# Altium PCB SmartSwitchD2_PowerBoard_1v2.PCBDOC
Units mm, origin at the board's own origin, x right, y up, seen from the top; angles counter-clockwise.
Board outline 44 x 47.9 mm, 2 copper layers (Top Layer, Bottom Layer), stack 1.443 mm thick; 10 components, 4 nets, 18 pads, 31 vias.
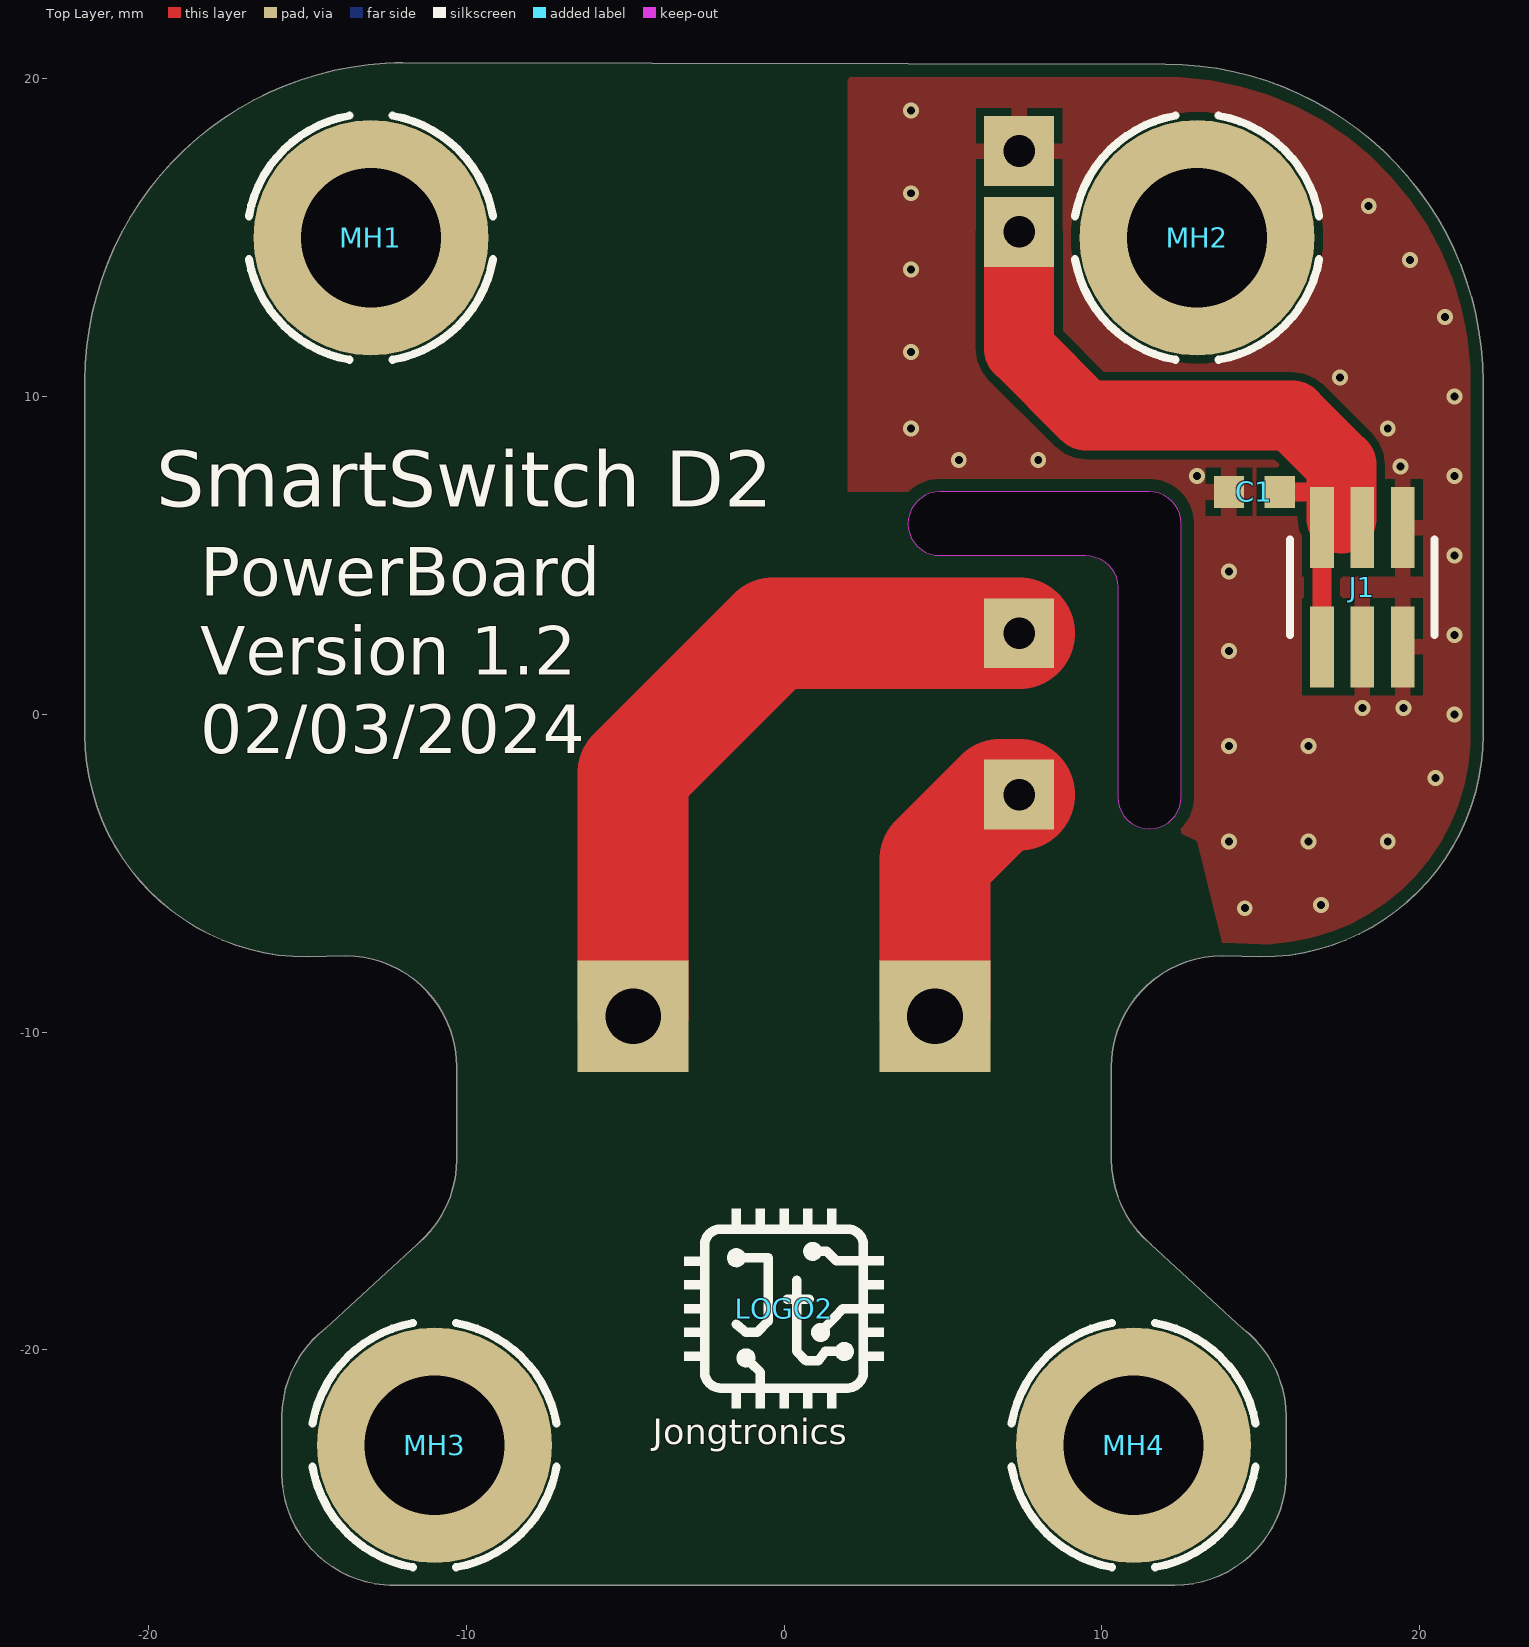
[diagram p0: Top Layer view]
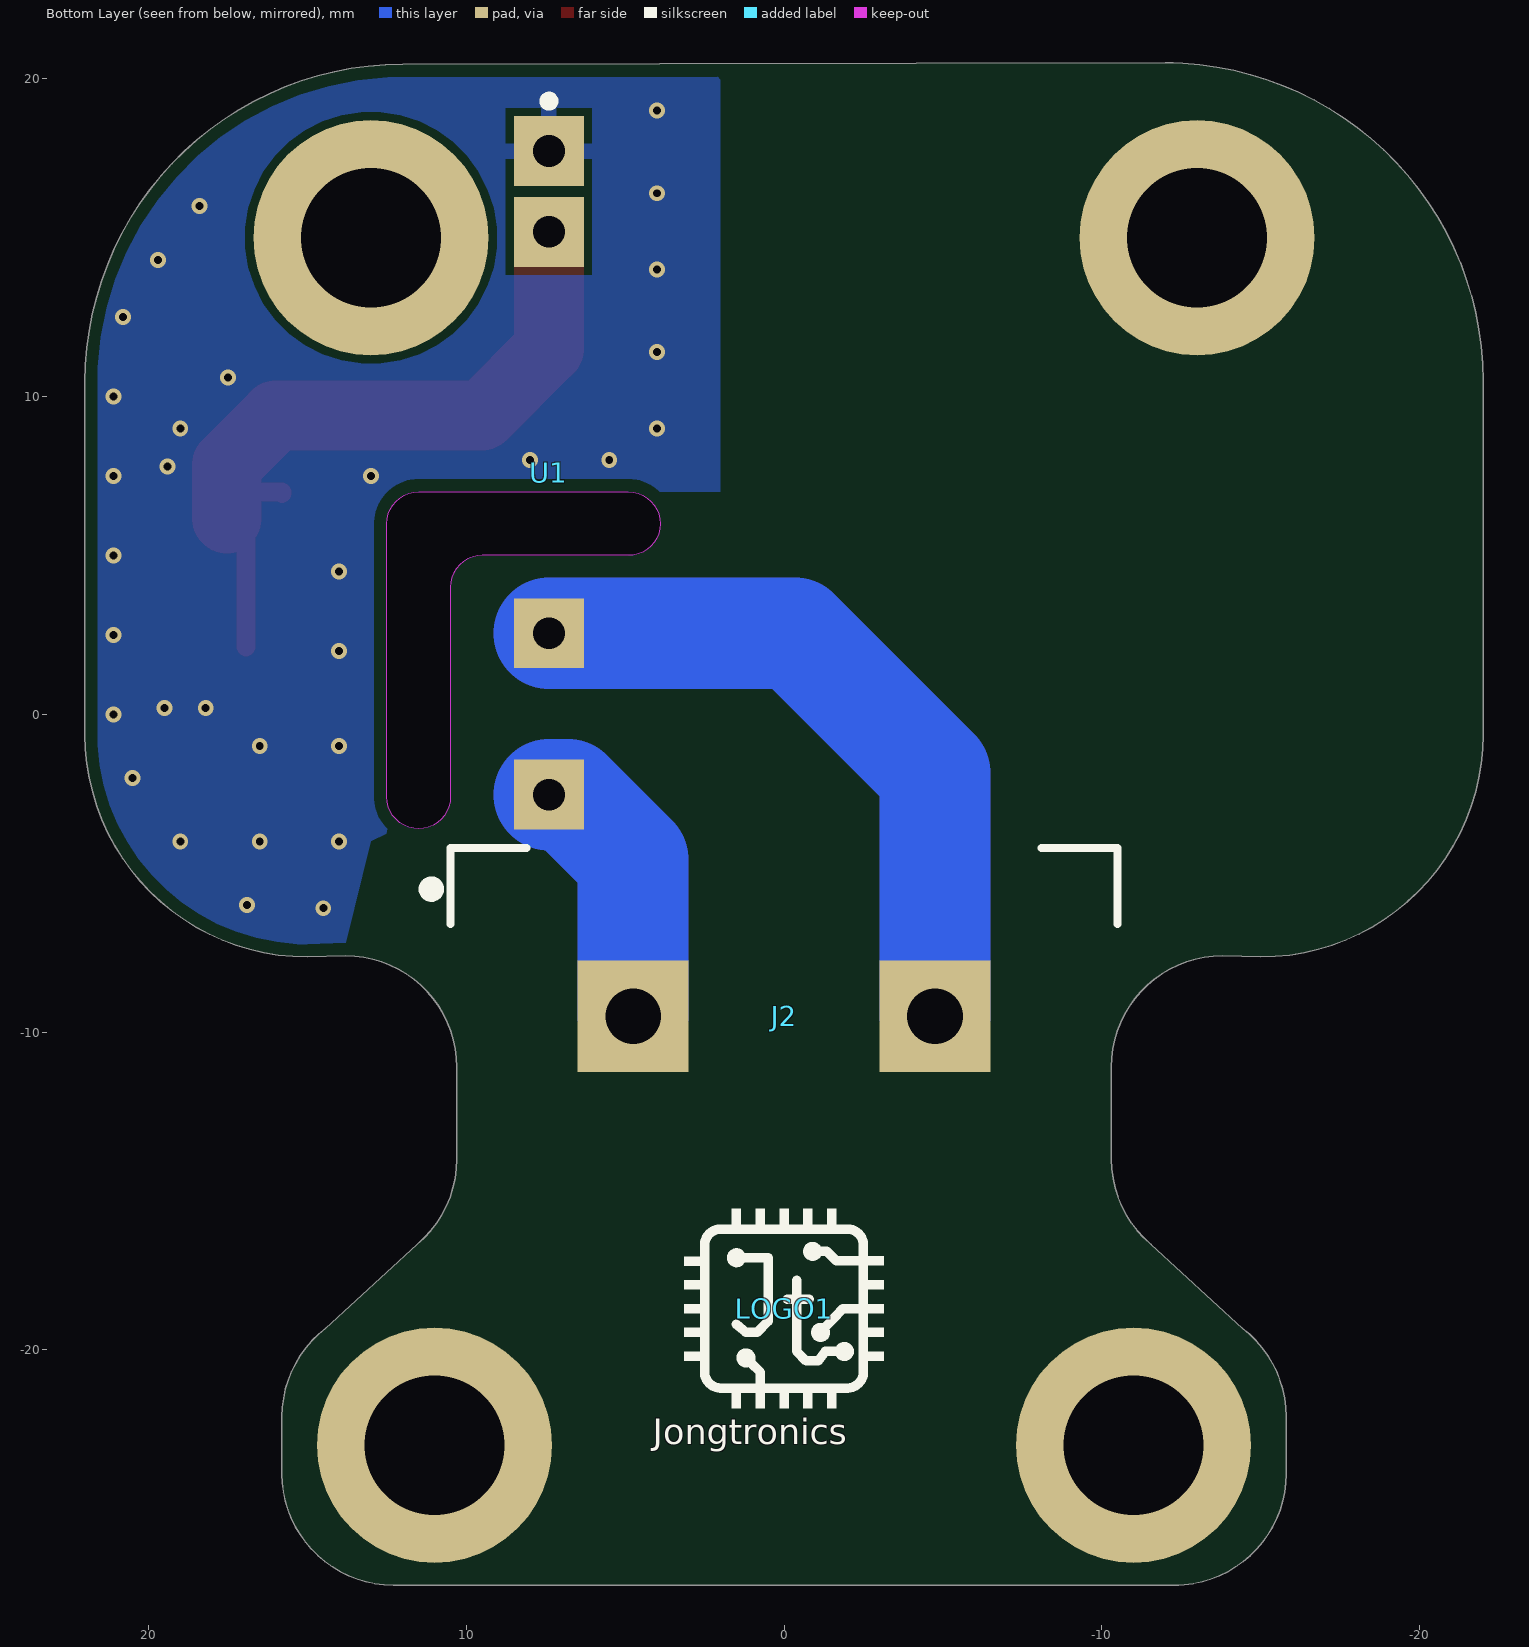
[diagram p1: Bottom Layer view, seen from below]

## Layer stack, top to bottom
TopSolder: solder mask 0.0127, Solder Resist, Dk 3.8
Top Layer: signal copper 0.035
Dielectric 1: core 0.0864, Composite dielectric, Dk 4.29
Dielectric 2: core 1.2, Composite dielectric, Dk 4.29
Dielectric 3: core 0.0864, Composite dielectric, Dk 4.29
Bottom Layer: signal copper 0.035
BottomSolder: solder mask 0.0127, Solder Resist, Dk 3.8

## Board outline
-15.8,-23.9 ccw(c-12.3,-23.9) -12.3,-27.4 -12.415,-27.4 12.3,-27.4 ccw(c12.3,-23.9) 15.8,-23.9 15.8,-22.1 ccw(c12.3,-22.1) 14.431,-19.323 11.549,-16.68 cw(c13.8,-14) 10.3,-14 10.3,-11.1 cw(c13.8,-11.1) 13.8,-7.6 15,-7.634 ccw(c15,-0.634) 22,-0.634 22,10.7 22,10.459 ccw(c12,10.459) 12,20.459 -12.246,20.5 -12,20.5 ccw(c-12,10.5) -22,10.5 -22,-0.634 ccw(c-15,-0.634) -15,-7.634 -13.8,-7.6 cw(c-13.8,-11.1) -10.3,-11.1 -10.3,-14 cw(c-13.8,-14) -11.549,-16.68 -14.431,-19.323 ccw(c-12.3,-22.1) -15.8,-22.1
cut-out: 3.9,6 ccw(c4.9,6) 4.9,5 9.5,5 cw(c9.5,4) 10.5,4 10.5,-2.6 ccw(c11.5,-2.6) 11.5,-3.6 ccw(c11.5,-2.6) 12.5,-2.6 12.5,6 ccw(c11.5,6) 11.5,7 4.9,7 ccw(c4.9,6)

## Design rules (kind name [scope] priority, off if disabled: settings)
BoardOutlineClearance [All] p1: gap=0.4 ignorepadtopadclearanceinfootprint=FALSE
Clearance ViaToPad [IsVia vs IsPad] p1: gap=0 ignorepadtopadclearanceinfootprint=FALSE except(0.254: SMDPad-Via)
Clearance [All] p2: gap=0.254 ignorepadtopadclearanceinfootprint=FALSE except(0.127: Arc-Arc Arc-Track Arc-SMDPad Arc-THPad Arc-Via Track-Track Track-SMDPad Track-THPad Track-Via SMDPad-SMDPad SMDPad-THPad)
ComponentClearance [All] p1: gap=0 collisioncheckmode=3 verticalgap=0 showdistances=TRUE checkcomponentboundary=TRUE
DiffPairsRouting DiffPairCAN [InDifferentialPair('CAN')] p1: maxlimit=0.165 minlimit=0.165 mostfreqgap=0.165 toplayer_minwidth=0.108 toplayer_maxwidth=0.108 toplayer_prefwidth=0.108 bottomlayer_minwidth=0.108 bottomlayer_maxwidth=0.108 bottomlayer_prefwidth=0.108 maxuncoupledlength=12.7 // 120Ohm
DiffPairsRouting DiffPairUSB [InDifferentialPair('ESP_USB')] p2: maxlimit=0.127 minlimit=0.127 mostfreqgap=0.127 toplayer_minwidth=0.206 toplayer_maxwidth=0.206 toplayer_prefwidth=0.206 bottomlayer_minwidth=0.206 bottomlayer_maxwidth=0.206 bottomlayer_prefwidth=0.206 maxuncoupledlength=12.7 // 90Ohm
FabricationTestPointUsage TestPointUsage [All] p1: valid=0 allowmultiple=FALSE
FabricationTestpoint Testpoint [All] p1: side=3 testpointundercomponent=TRUE minsize=1.016 maxsize=2.54 preferedsize=1.524 minholesize=0.508 maxholesize=1.016 preferedholesize=0.813 testpointgrid=0.025 allowsidetop=TRUE allowsidebottom=TRUE usegrid=TRUE gridtolerance=0
PlaneClearance [All] p1: clearance=0.254
PolygonConnect [All] p1: thpad.connectstyle=Relief thpad.reliefconductorwidth=0.508 thpad.reliefentries=4 thpad.polygonreliefangle="90 Angle" thpad.airgapwidth=0.254 smdpad.connectstyle=Relief smdpad.reliefconductorwidth=0.508 smdpad.reliefentries=4 smdpad.polygonreliefangle="90 Angle" smdpad.airgapwidth=0.254 via.connectstyle=Direct via.reliefconductorwidth=0.254 via.reliefentries=4 via.polygonreliefangle="90 Angle" via.airgapwidth=0.254
RoutingVias ViasPower [InNetClass('Power')] p1: holewidth=0.3 width=0.6 viastyle="Through Hole" minholewidth=0.25 minwidth=0.5 maxholewidth=0.3 maxwidth=0.6
RoutingVias Vias [All] p2: holewidth=0.25 width=0.5 viastyle="Through Hole" minholewidth=0.25 minwidth=0.5 maxholewidth=0.3 maxwidth=0.6
SilkToSolderMaskClearance SilkscreenOverComponentPads [IsPad] p1: minsilkscreentomaskgap=0.254 clearancetoexposedcopper=TRUE
SolderMaskExpansion SolderMaskExpansionVia [IsVia] p1: expansion=0 istentingtop=TRUE
SolderMaskExpansion [All] p2: expansion=0.051 istentingtop=FALSE
Width Width50Ohm [InNetClass('50Ohm')] p1: maxlimit=0.14 minlimit=0.14 preferedwidth=0.14 minimp=50.000000 maximp=50.000000 favimp=50.000000
Width WidthPower [InNetClass('Power')] p2: maxlimit=3.5 minlimit=0.203 preferedwidth=0.508 minimp=50.000000 maximp=50.000000 favimp=50.000000
Width [All] p3: maxlimit=1.143 minlimit=0.102 preferedwidth=0.165 minimp=50.000000 maximp=50.000000 favimp=50.000000
24 further rules are at their usual default settings.

## Classes and differential pairs
net class Power: AC_IN_L AC_IN_N GND VCC

## Components (designator, comment, footprint, x,y, rotation, side; value= is the part's Value field where it differs from the comment)
C1 "CAP-0603 10uF 35VDC 20% X5R" C0603 14.8,7 r0 top value=10uF
J1 "Header Male 2x3 - 3mm height - 0.05\" (1.27mm)" "HEADER MALE 2x3 1.27MM" 18.2,4 r0 top
J2 "Thermal Block 9.5mm pitch 750V Screw terminal 1x2" "TH Block HB9500 1x2" 4.75,-9.5 r180 bottom
LOGO1 "Logo Jongtronics" LOGO_JONGTRONICS 0,-18.7 r180 bottom
LOGO2 "Logo Jongtronics" LOGO_JONGTRONICS 0,-18.7 r0 top
MH1 "Spacer Threaded M3 x 4mm SMD" "SPACER THREADED M3 x 4mm" -13,15 r0 top locked
MH2 "Spacer Threaded M3 x 4mm SMD" "SPACER THREADED M3 x 4mm" 13,15 r0 top locked
MH3 "Spacer Threaded M3 x 4mm SMD" "SPACER THREADED M3 x 4mm" -11,-23 r0 top locked
MH4 "Spacer Threaded M3 x 4mm SMD" "SPACER THREADED M3 x 4mm" 11,-23 r0 top locked
U1 "AC-DC 5V 700mA Precision Buck Converter Step Down Transformator Module" WX-DC12003 7.4,7.6 r270 bottom locked

## Footprints (in the part's own frame and the unit in brackets; to place one, negate y for a bottom-side part, rotate by r counter-clockwise, add the part's x,y. Pads: shape width x height; smd on the part's side, far side on the other; paste and mask are expansions set on the pad)
C0603 [mm] "C0603"
  rect 0.95x1 smd: 1(-0.8,0) 2(0.8,0)
  body extent -0.8,-0.4 0.8,0.4, height 0.87
"HEADER MALE 2x3 1.27MM" [mm]
  rect 0.74x2.55 smd: 1(-1.27,-1.875) 2(-1.27,1.875) 3(0,-1.875) 4(0,1.875) 5(1.27,-1.875) 6(1.27,1.875)
  silkscreen extent -2.27,-1.5 2.27,1.5, body extent -2.15,-2.75 2.15,2.75, height 5.33
LOGO_JONGTRONICS [mm]
  silkscreen extent -3.15,-3.15 3.15,3.15
"SPACER THREADED M3 x 4mm" [mm]
  round 7.4 hole 4.4: MH(0,0)
  silkscreen extent -3.84,-3.84 3.84,3.84, body extent -3,-3 3,3, height 4
"TH Block HB9500 1x2" [mm]
  rect 3.5x3.5 hole 1.75: 1(0,0) 2(9.5,0)
  silkscreen extent -6.55,2.9 15.25,5.3, body extent -5.5,-10.92 15,5.08, height 18.2
WX-DC12003 [mm]
  rect 2.2x2.2 hole 1: 1(-10.126,0) 2(-7.586,0) 3(5.046,0) 4(10.126,0)
  silkscreen extent -11.85,-0.15 -11.55,0.15, body extent -12.15,-1.3 11.4,16.85, height 15.34

## Part data
C1: library part "C 0603 10uF 35V", Case-EIA=0603, Case-Metric=1608, Manufacturer 1="Murata Electronics", Manufacturer Part Number 1=GRM188R6YA106MA73D, Rated Voltage=35V, Supplier Part Number 1=81-GRM188R6YA106MA3D, Tolerance=20%, Datasheet=https://nl.mouser.com/datasheet/2/281/murata_03052018_GRM_Series_1-1310166.pdf, Default Designator=C?, Part Number="C 0603 10uF 35V", Supplier 1=Mouser
J1: library part "Header Male 2x3 0.05\" (1.27mm)", "Header Male 2x3 - 4.68mm height - 0.05\" (1.27mm)", Manufacturer 1=Harwin, Manufacturer Part Number 1=M50-3600342, Supplier Part Number 1=855-M50-3600342, Datasheet=https://nl.mouser.com/ProductDetail/Harwin/M50-3600342?qs=uLfVlVfCHH3O1msIjvLxbQ%3D%3D, Default Designator=J?, Part Number="Header Male 2x3 0.05\" (1.27mm)", Supplier 1=Mouser
J2: library part "Screw Thermal Block 1x2", Manufacturer 1="Cixi Kefa Elec", Manufacturer Part Number 1=HB9500-9.5-2P, Supplier Part Number 1=C707836, Datasheet=https://datasheet.lcsc.com/lcsc/2010111035_Cixi-Kefa-Elec-HB9500-9-5-2P_C707836.pdf, Default Designator=J?, Part Number="Screw Thermal Block 1x2", Supplier 1="LCSC Electronics"
MH1 MH2 MH3 MH4: library part "Spacer Threaded M3 x 4mm", Manufacturer 1="Wurth Elektronik", Manufacturer Part Number 1=78614040360, Supplier Part Number 1=710-78614040360, Datasheet=https://www.we-online.com/components/products/datasheet/78614040360.pdf, Default Designator=MH?, Part Number="Spacer Threaded M3 x 4mm", Supplier 1=Mouser
U1: library part WX-DC12003, Default Designator=U?, Manufacturer Part Number 1=WX-DC12003, Part Number=WX-DC12003
LOGO1 LOGO2: Default Designator=LOGO?, Part Number="Logo Jongtronics"

## Via types
v1: diameter 0.5, hole 0.25, Top Layer to Bottom Layer, tented both sides, 31 vias

## Nets (pads, with @x,y where several pads share a name; then routed paths per layer and width w, separated by ;. In a path a pad name is that pad's centre, name@x,y a point inside that pad or via, vN(x,y) a via of type N, cw(c..) or ccw(c..) an arc to the next point about the centre after c; other vN are vias at no path point)
AC_IN_L: J2.1 U1.4 | length 16.8
  Top Layer w3.5: J2.1 4.75,-4.577 6.8,-2.526 U1.4
  Bottom Layer w3.5: J2.1 4.75,-4.577 6.8,-2.526 U1.4
AC_IN_N: J2.2 U1.3 | length 43.2
  Top Layer w3.5: J2.2 -4.75,-1.85 -0.346,2.554 U1.3
  Bottom Layer w3.5: J2.2 -4.75,-1.85 -0.346,2.554 U1.3
GND: C1.1 J1.3 J1.5 J1.6 U1.1
  other v1: 14.5,-6.1 16.9,-6 14,-4 16.5,-4 19,-4 20.5,-2 14,-1 16.5,-1 21.1,0 18.2,0.2 19.5,0.2 14,2 21.1,2.5 14,4.5 21.1,5 13,7.5 21.1,7.5 19.4,7.8 5.5,8 8,8 4,9 19,9 21.1,10 17.5,10.6 4,11.4 20.8,12.5 4,14 19.7,14.3 18.4,16 4,16.4 4,19
VCC: C1.2 J1.1 J1.2 J1.4 U1.2 | length 22.9
  Top Layer w0.6: C1.2@15.8,6.95 15.8,7 16.698,7 17.539,6.159 ; J1.1 J1.2
  Top Layer w2.2: U1.2 7.4,11.5 9.5,9.4 16,9.4 17.539,7.861 17.539,6.159
pads on no net: MH1.MH MH2.MH MH3.MH MH4.MH

## Polygon pours and split planes (outlines as drawn)
GND on Bottom Layer "GND_L01_P-001" (solid, pour order 1): 13,-4 12,-3.5 11,7 2,7 2,21 22,21 22,-8 14,-8
GND on Top Layer "GND_L01_P-001" (solid, pour order 0): 13,-4 12,-3.5 11,7 2,7 2,21 22,21 22,-8 14,-8

## Other copper
Top Layer:
  text "'.Layer_Name'" at -8.08,50.665 h1.52
Bottom Layer:
  text "'.Layer_Name'" at -8.08,50.665 h1.52

## Silkscreen, mask and mechanical layers (free items; w line width, h text height)
TopOverlay:
  text "'.Layer_Name'" at -8.08,50.665 h1.52
  text "SmartSwitch D2" at -19.762,5.949 h3
  text "PowerBoard" at -18.37,3.731 h1.52
  text "Version 1.2" at -18.371,1.251 h1.52
  text "02/03/2024" at -18.372,-1.228 h1.52
BottomOverlay:
  text "'.Layer_Name'" at -8.08,50.665 h1.52
TopPaste:
  text "'.Layer_Name'" at -8.08,50.665 h1.52
BottomPaste:
  text "'.Layer_Name'" at -8.08,50.564 h1.52
TopSolder:
  text "'.Layer_Name'" at -8.08,50.665 h1.52
BottomSolder:
  text "'.Layer_Name'" at -8.08,50.564 h1.52
DrillGuide:
  text "'.Layer_Name'" at -8.08,50.665 h1.52
BoardOutline:
  lines w0.8: -12.415,-27.4 12.3,-27.4 ccw(c12.3,-23.9) 15.8,-23.9 15.8,-22.1 ccw(c12.3,-22.1) 14.431,-19.323 11.549,-16.68 cw(c13.8,-14) 10.3,-14 10.3,-11.1 cw(c13.8,-11.1) 13.8,-7.6 ; -12.3,-27.4 cw(c-12.3,-23.9) -15.8,-23.9 -15.8,-22.1 cw(c-12.3,-22.1) -14.431,-19.323 -11.549,-16.68 ccw(c-13.8,-14) -10.3,-14 -10.3,-11.1 ccw(c-13.8,-11.1) -13.8,-7.6 -15,-7.634 cw(c-15,-0.634) -22,-0.634 -22,10.5 cw(c-12,10.5) -12,20.5 ; -12.246,20.5 12,20.459 cw(c12,10.459) 22,10.459 ; 22,10.7 22,-0.634 cw(c15,-0.634) 15,-7.634 ; 13.8,-7.6 15,-7.634 ; 13.8,-7.6 15,-7.634 ; 3.9,6 ccw(c4.9,6) 4.9,5 9.5,5 cw(c9.5,4) 10.5,4 10.5,-2.6 ccw(c11.5,-2.6) 11.5,-3.6 ccw(c11.5,-2.6) 12.5,-2.6 12.5,6 ccw(c11.5,6) 11.5,7 4.9,7 ccw(c4.9,6) 3.9,6
  text "'.Layer_Name'" at -8.08,50.665 h1.52
BoardDimensions:
  text "'.Layer_Name'" at -8.08,50.665 h1.52
BoardTitle:
  lines w0.256: -26.073,52.638 13.927,52.638 ; -9.073,49.638 -9.073,60.638 ; 13.927,55.638 -26.073,55.638 ; -26.073,55.638 -26.073,49.638 13.927,49.638 13.927,60.638 -9.073,60.638 ; -26.073,55.638 -26.073,60.638 -9.073,60.638
  text "SSD2 PowerBoard" at -8.063,57.565 h1.52
  text "Project :" at -25.063,57.539 h1.52
  text "Revision :" at -25.063,53.551 h1.52
  text "1.2" at -8.063,53.348 h1.52
  text "Layer :" at -25.063,50.63 h1.52
Top Assembly:
  text "'.Layer_Name'" at -8.08,50.564 h1.52
Bottom Assembly:
  text "'.Layer_Name'" at 10.148,50.529 h1.52
Mechanical7:
  circle w0.2: c16,-14 r5.5
  circle w0.2: c-16,-14 r5.5
  circle w0.2: c0,-2 r30
  lines w0.2: -1.414,-3.414 1.414,-0.586 ; -1.414,-0.586 1.414,-3.414 ; -23.8,-25.8 23.8,-25.8 23.8,21.8 -23.8,21.8 -23.8,-25.8
  lines w0.8: -23.8,-25.8 -23.8,-24.386 -22.386,-25.8 -23.8,-25.8 ; -23.8,20.386 -23.8,21.8 -22.386,21.8 -23.8,20.386 ; 22.386,-25.8 23.8,-25.8 23.8,-24.386 22.386,-25.8 ; 22.386,21.8 23.8,20.386 23.8,21.8 22.386,21.8
Top Courtyard:
  text "'.Layer_Name'" at -8.08,50.564 h1.52
Bottom Courtyard:
  text "'.Layer_Name'" at -8.08,50.564 h1.52
Mechanical 8:
  circle w0.2: c-13,15 r2.2
  circle w0.2: c13,15 r2.2
  circle w0.2: c11,-23 r2.2
  circle w0.2: c-11,-23 r2.2
DrillDrawing:
  circle w0.254: c35.284,-6.902 r0.635
  lines w0.181: 33.49,-11.252 127.167,-11.252 ; 33.49,0.178 127.167,0.178 ; 44.188,-14.109 44.188,3.036 ; 54.409,-14.109 54.409,3.036 ; 76.437,-14.109 76.437,3.036 ; 86.277,-14.109 86.277,3.036 ; 100.459,-14.109 100.459,3.036 ; 111.899,-14.109 111.899,3.036 ; 33.49,-14.109 127.167,-14.109 127.167,3.036 33.49,3.036 33.49,-14.109
  lines w0.254: 34.649,-10.395 35.284,-10.077 35.919,-10.395 35.602,-9.76 35.919,-9.125 35.284,-9.442 34.649,-9.125 34.967,-9.76 34.649,-10.395 ; 34.649,-4.68 35.919,-4.68 35.919,-3.41 34.649,-3.41 34.649,-4.68 ; 34.649,-0.552 35.919,-0.552 35.284,-1.822 34.649,-0.552
  text "'.Layer_Name'" at -8.08,50.564 h1.52
  text "Symbol" at 35.205,1.035 h1.37
  text "Count" at 45.045,1.035 h1.37
  text "Hole Size" at 55.266,1.035 h1.37
  text "Plated" at 77.294,1.035 h1.37
  text "Hole Type" at 87.134,1.035 h1.37
  text "Via/Pad" at 101.316,1.035 h1.37
  text "Pad Shape" at 112.756,1.035 h1.37
  text "31" at 45.045,-1.822 h1.14
  text "0.250mm (9.84mil)" at 55.266,-1.822 h1.14
  text "PTH" at 77.294,-1.822 h1.14
  text "Round" at 87.134,-1.822 h1.14
  text "Via" at 101.316,-1.822 h1.14
  text "Rounded" at 112.756,-1.822 h1.14
  text "4" at 45.045,-4.68 h1.14
  text "1.000mm (39.37mil)" at 55.266,-4.68 h1.14
  text "PTH" at 77.294,-4.68 h1.14
  text "Round" at 87.134,-4.68 h1.14
  text "Pad" at 101.316,-4.68 h1.14
  text "Rectangle" at 112.756,-4.68 h1.14
  text "2" at 45.045,-7.537 h1.14
  text "1.750mm (68.90mil)" at 55.266,-7.537 h1.14
  text "PTH" at 77.294,-7.537 h1.14
  text "Round" at 87.134,-7.537 h1.14
  text "Pad" at 101.316,-7.537 h1.14
  text "Rectangle" at 112.756,-7.537 h1.14
  text "4" at 45.045,-10.395 h1.14
  text "4.400mm (173.23mil)" at 55.266,-10.395 h1.14
  text "PTH" at 77.294,-10.395 h1.14
  text "Round" at 87.134,-10.395 h1.14
  text "Pad" at 101.316,-10.395 h1.14
  text "Rounded" at 112.756,-10.395 h1.14
  text "41 Total" at 45.045,-13.252 h1.14

## Dimensions
12.3,-27.4 to 12,20.459 on BoardDimensions
-22,-0.634 to 22,-0.634 on BoardDimensions

## Text inside footprints (layer, text, board x,y; h text height)
LOGO1: BottomOverlay "Jongtronics" at 4.132,-22.967 h0.8
LOGO2: TopOverlay "Jongtronics" at -4.132,-22.967 h0.8